# Altium PCB Bracelet_Aux_v1.0.PcbDoc
Units mil, origin at the board's own origin, x right, y up, seen from the top; angles counter-clockwise.
Board outline 590.55 x 236.42 mil, 2 copper layers (Top Layer, Bottom Layer), stack 57 mil thick; 9 components, 4 nets, 51 pads, 3 vias.
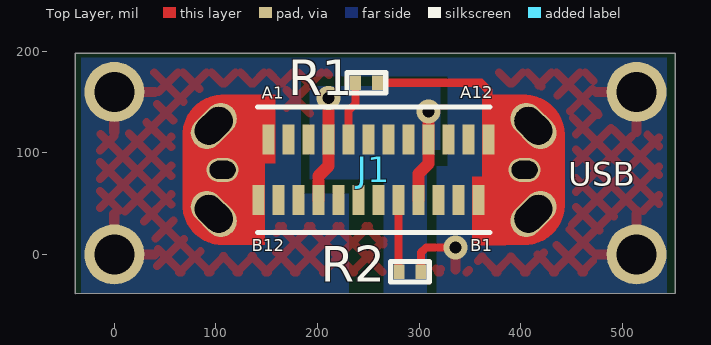
[diagram p0: Top Layer view]
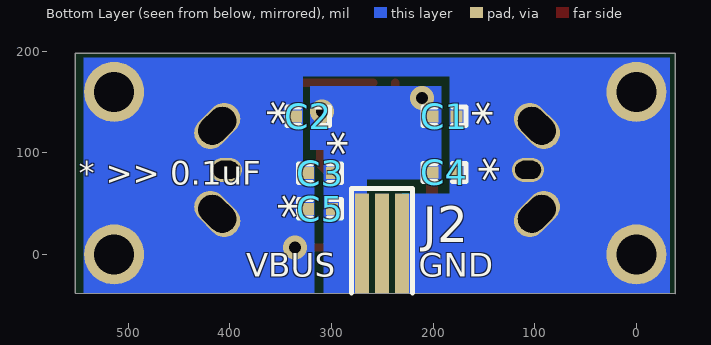
[diagram p1: Bottom Layer view, seen from below]
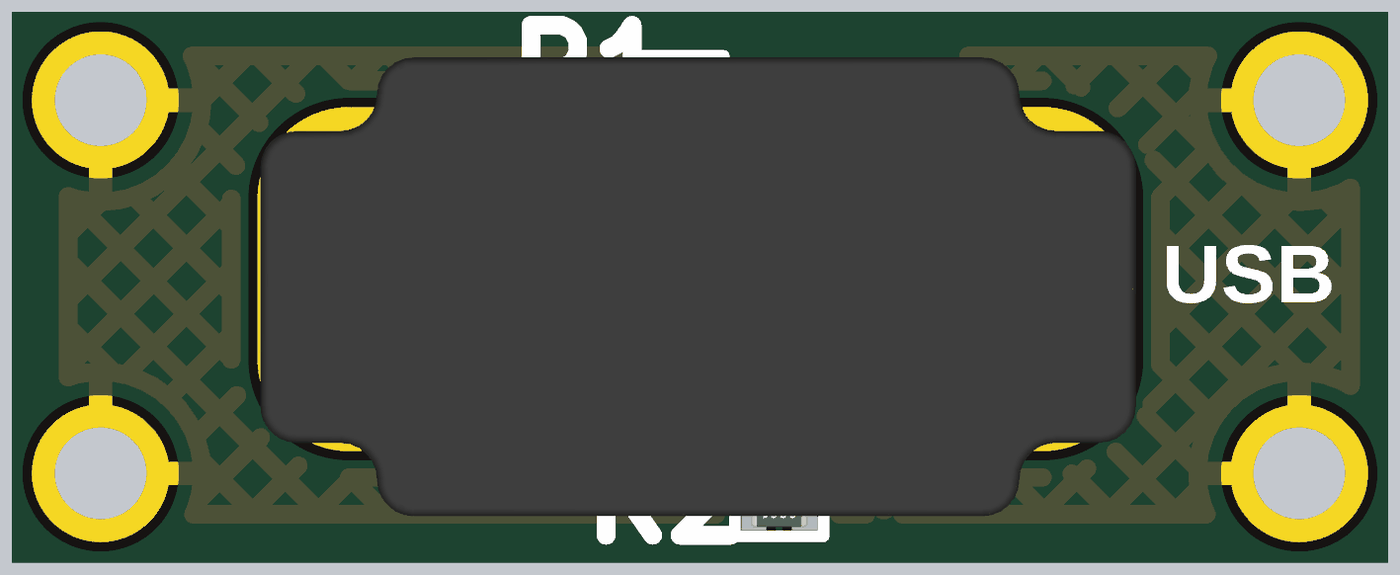
[diagram p2: 3D render of the assembled board from above, using the file's embedded part models]
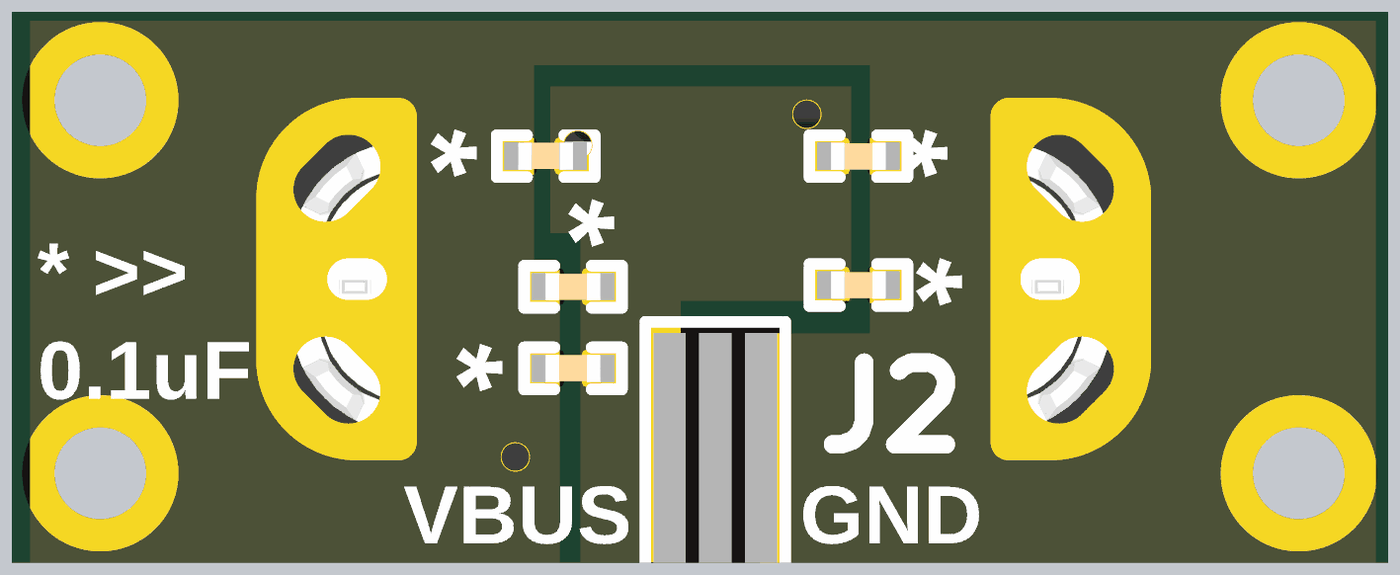
[diagram p3: 3D render of the assembled board from below, using the file's embedded part models]

## Layer stack, top to bottom
Top Solder: solder mask 3, Solder Resist, Dk 3.5
Top Layer: signal copper 10
Dielectric 1: dielectric 37, FR-4, Dk 4.8
Bottom Layer: signal copper 10
Bottom Solder: solder mask 3, Solder Resist, Dk 3.5

## Board outline
-38.35,-38.42 -38.35,198 552.2,198 552.2,-38.39

## Design rules (kind name [scope] priority, off if disabled: settings)
Clearance [All] p1: gap=7 ignorepadtopadclearanceinfootprint=FALSE except(0: Arc-Hole Track-Hole SMDPad-Hole THPad-Hole Via-Hole Fill-Hole Poly-Hole Region-Hole Text-Hole; 3: Arc-SMDPad Track-SMDPad SMDPad-SMDPad)
HoleToHoleClearance [All] p1: gap=0 allowstackedmicrovias=TRUE
MinimumSolderMaskSliver [All] p1: minsoldermaskwidth=0
PolygonConnect [All] p1: thpad.connectstyle=Relief thpad.reliefconductorwidth=10 thpad.reliefentries=4 thpad.polygonreliefangle="90 Angle" thpad.airgapwidth=10 smdpad.connectstyle=Direct smdpad.reliefconductorwidth=10 smdpad.reliefentries=4 smdpad.polygonreliefangle="90 Angle" smdpad.airgapwidth=10 via.connectstyle=Relief via.reliefconductorwidth=10 via.reliefentries=4 via.polygonreliefangle="90 Angle" via.airgapwidth=10
RoutingVias [All] p1: holewidth=11.81 width=23.62 viastyle="Through Hole" minholewidth=11.81 minwidth=23.62 maxholewidth=11.81 maxwidth=23.62
SilkToSilkClearance [All] p1: silktosilkclearance=0
SilkToSolderMaskClearance [IsPad] p1: minsilkscreentomaskgap=0 clearancetoexposedcopper=TRUE
SolderMaskExpansion [All] p1: expansion=4
Width [All] p1: maxlimit=40 minlimit=8 preferedwidth=22
26 further rules are at their usual default settings.

## Classes and differential pairs
component class U_Connector_Section: C1 C2 C3 C4 C5 J2 R1 R2

## Components (designator, comment, footprint, x,y, rotation, side; value= is the part's Value field where it differs from the comment)
C1 "0.1uF" "CAP 0201" 188.87,136 r180 bottom
C2 "0.1uF" "CAP 0201" 323,136 r0 bottom
C3 "0.1uF" "CAP 0201" 311.27,80 r0 bottom
C4 "0.1uF" "CAP 0201" 188.87,80.73 r180 bottom
C5 "0.1uF" "CAP 0201" 311.27,45 r0 bottom
J1 "CX80B1-24P" CX80B1-24P 255.24,83.28 r0 top locked
J2 "3 Pin FPC" "3 Pin FPC" 250.24,11 r180 bottom
R1 "5.1K" Res-0201 248.17,169 r180 top
R2 "5.1K" Res-0201 291,-17 r180 top

## Footprints (in the part's own frame and the unit in brackets; to place one, negate y for a bottom-side part, rotate by r counter-clockwise, add the part's x,y. Pads: shape width x height; smd on the part's side, far side on the other; paste and mask are expansions set on the pad)
"3 Pin FPC" [mm]
  rect 0.35x2.5 smd: 1(-0.5,0) 2(0,0) 3(0.5,0)
  silkscreen extent -0.76,-1.24 0.76,1.37
"CAP 0201" [mm]
  rect 0.3x0.3 smd mask+0.055: 1(-0.3,0) 2(0.3,0)
  silkscreen extent -0.53,-0.23 0.53,0.23, body extent -0.3,-0.15 0.3,0.15, height 0.28
CX80B1-24P [mm]
  rect 0.3x0.75 smd: A1(-2.625,0.755) A2(-2.125,0.755) A3(-1.625,0.755) A4(-1.125,0.755) A5(-0.625,0.755) A6(-0.125,0.755) A7(0.375,0.755) A8(0.875,0.755) A9(1.375,0.755) A10(1.875,0.755) A11(2.375,0.755) A12(2.875,0.755) B1(2.625,-0.755) B2(2.125,-0.755) B3(1.625,-0.755) B4(1.125,-0.755) B5(0.625,-0.755) B6(0.125,-0.755) B7(-0.375,-0.755) B8(-0.875,-0.755) B9(-1.375,-0.755) B10(-1.875,-0.755) B11(-2.375,-0.755) B12(-2.875,-0.755)
  oval 1.3x0.8 hole 0.7 slot 1.05 at 45 deg rot 45: MH1(-3.995,1.1) MH4(3.995,-1.1)
  oval 0.8x0.6 hole 0.45 slot 0.65 at 0 deg: MH2(-3.775,0) MH5(3.775,0)
  oval 1.3x0.8 hole 0.7 slot 1.05 at 135 deg rot 135: MH3(-3.995,-1.1) MH6(3.995,1.1)
  Top Layer region: 3.827,1.874 3.88,1.87 3.931,1.863 3.983,1.853 4.034,1.841 4.084,1.826 4.133,1.809 4.182,1.789 4.229,1.766 4.275,1.741 4.32,1.714 4.363,1.684 4.404,1.652 4.444,1.618 4.482,1.582 4.518,1.544 4.552,1.504 4.584,1.463 4.614,1.42 4.641,1.375 4.666,1.329 4.689,1.282 4.709,1.233 4.726,1.184 4.741,1.134 4.753,1.083 4.763,1.031 4.77,0.98 4.774,0.927 4.775,0.875 4.775,-0.875 4.774,-0.927 4.77,-0.98 4.763,-1.031 4.753,-1.083 4.741,-1.134 4.726,-1.184 4.709,-1.233 4.689,-1.282 4.666,-1.329 4.641,-1.375 4.614,-1.42 4.584,-1.463 4.552,-1.504 4.518,-1.544 4.482,-1.582 4.444,-1.618 4.404,-1.652 4.363,-1.684 4.32,-1.714 4.275,-1.741 4.229,-1.766 4.182,-1.789 4.133,-1.809 4.084,-1.826 4.034,-1.841 3.983,-1.853 3.931,-1.863 3.88,-1.87 3.827,-1.874 3.775,-1.875 3.325,-1.875 3.32,-1.875 3.315,-1.874 3.309,-1.874 3.304,-1.873 3.299,-1.872 3.294,-1.87 3.289,-1.868 3.284,-1.866 3.28,-1.864 3.275,-1.862 3.271,-1.859 3.266,-1.856 3.262,-1.853 3.258,-1.849 3.254,-1.846 3.251,-1.842 3.247,-1.838 3.244,-1.834 3.241,-1.829 3.238,-1.825 3.236,-1.82 3.234,-1.816 3.232,-1.811 3.23,-1.806 3.228,-1.801 3.227,-1.796 3.226,-1.791 3.226,-1.785 3.225,-1.78 3.225,-1.775 3.225,1.775 3.225,1.78 3.226,1.785 3.226,1.791 3.227,1.796 3.228,1.801 3.23,1.806 3.232,1.811 3.234,1.816 3.236,1.82 3.238,1.825 3.241,1.829 3.244,1.834 3.247,1.838 3.251,1.842 3.254,1.846 3.258,1.849 3.262,1.853 3.266,1.856 3.271,1.859 3.275,1.862 3.28,1.864 3.284,1.866 3.289,1.868 3.294,1.87 3.299,1.872 3.304,1.873 3.309,1.874 3.315,1.874 3.32,1.875 3.325,1.875 3.775,1.875
  Top Layer region: -3.32,1.875 -3.315,1.874 -3.309,1.874 -3.304,1.873 -3.299,1.872 -3.294,1.87 -3.289,1.868 -3.284,1.866 -3.28,1.864 -3.275,1.862 -3.271,1.859 -3.266,1.856 -3.262,1.853 -3.258,1.849 -3.254,1.846 -3.251,1.842 -3.247,1.838 -3.244,1.834 -3.241,1.829 -3.238,1.825 -3.236,1.82 -3.234,1.816 -3.232,1.811 -3.23,1.806 -3.228,1.801 -3.227,1.796 -3.226,1.791 -3.226,1.785 -3.225,1.78 -3.225,1.775 -3.225,-1.775 -3.225,-1.78 -3.226,-1.785 -3.226,-1.791 -3.227,-1.796 -3.228,-1.801 -3.23,-1.806 -3.232,-1.811 -3.234,-1.816 -3.236,-1.82 -3.238,-1.825 -3.241,-1.829 -3.244,-1.834 -3.247,-1.838 -3.251,-1.842 -3.254,-1.846 -3.258,-1.849 -3.262,-1.853 -3.266,-1.856 -3.271,-1.859 -3.275,-1.862 -3.28,-1.864 -3.284,-1.866 -3.289,-1.868 -3.294,-1.87 -3.299,-1.872 -3.304,-1.873 -3.309,-1.874 -3.315,-1.874 -3.32,-1.875 -3.325,-1.875 -3.775,-1.875 -3.827,-1.874 -3.88,-1.87 -3.931,-1.863 -3.983,-1.853 -4.034,-1.841 -4.084,-1.826 -4.133,-1.809 -4.182,-1.789 -4.229,-1.766 -4.275,-1.741 -4.32,-1.714 -4.363,-1.684 -4.404,-1.652 -4.444,-1.618 -4.482,-1.582 -4.518,-1.544 -4.552,-1.504 -4.584,-1.463 -4.614,-1.42 -4.641,-1.375 -4.666,-1.329 -4.689,-1.282 -4.709,-1.233 -4.726,-1.184 -4.741,-1.134 -4.753,-1.083 -4.763,-1.031 -4.77,-0.98 -4.774,-0.927 -4.775,-0.875 -4.775,0.875 -4.774,0.927 -4.77,0.98 -4.763,1.031 -4.753,1.083 -4.741,1.134 -4.726,1.184 -4.709,1.233 -4.689,1.282 -4.666,1.329 -4.641,1.375 -4.614,1.42 -4.584,1.463 -4.552,1.504 -4.518,1.544 -4.482,1.582 -4.444,1.618 -4.404,1.652 -4.363,1.684 -4.32,1.714 -4.275,1.741 -4.229,1.766 -4.182,1.789 -4.133,1.809 -4.084,1.826 -4.034,1.841 -3.983,1.853 -3.931,1.863 -3.88,1.87 -3.827,1.874 -3.775,1.875 -3.325,1.875
  Bottom Layer region: -3.32,1.875 -3.315,1.874 -3.309,1.874 -3.304,1.873 -3.299,1.872 -3.294,1.87 -3.289,1.868 -3.284,1.866 -3.28,1.864 -3.275,1.862 -3.271,1.859 -3.266,1.856 -3.262,1.853 -3.258,1.849 -3.254,1.846 -3.251,1.842 -3.247,1.838 -3.244,1.834 -3.241,1.829 -3.238,1.825 -3.236,1.82 -3.234,1.816 -3.232,1.811 -3.23,1.806 -3.228,1.801 -3.227,1.796 -3.226,1.791 -3.226,1.785 -3.225,1.78 -3.225,1.775 -3.225,-1.775 -3.225,-1.78 -3.226,-1.785 -3.226,-1.791 -3.227,-1.796 -3.228,-1.801 -3.23,-1.806 -3.232,-1.811 -3.234,-1.816 -3.236,-1.82 -3.238,-1.825 -3.241,-1.829 -3.244,-1.834 -3.247,-1.838 -3.251,-1.842 -3.254,-1.846 -3.258,-1.849 -3.262,-1.853 -3.266,-1.856 -3.271,-1.859 -3.275,-1.862 -3.28,-1.864 -3.284,-1.866 -3.289,-1.868 -3.294,-1.87 -3.299,-1.872 -3.304,-1.873 -3.309,-1.874 -3.315,-1.874 -3.32,-1.875 -3.325,-1.875 -3.775,-1.875 -3.827,-1.874 -3.88,-1.87 -3.931,-1.863 -3.983,-1.853 -4.034,-1.841 -4.084,-1.826 -4.133,-1.809 -4.182,-1.789 -4.229,-1.766 -4.275,-1.741 -4.32,-1.714 -4.363,-1.684 -4.404,-1.652 -4.444,-1.618 -4.482,-1.582 -4.518,-1.544 -4.552,-1.504 -4.584,-1.463 -4.614,-1.42 -4.641,-1.375 -4.666,-1.329 -4.689,-1.282 -4.709,-1.233 -4.726,-1.184 -4.741,-1.134 -4.753,-1.083 -4.763,-1.031 -4.77,-0.98 -4.774,-0.927 -4.775,-0.875 -4.775,0.875 -4.774,0.927 -4.77,0.98 -4.763,1.031 -4.753,1.083 -4.741,1.134 -4.726,1.184 -4.709,1.233 -4.689,1.282 -4.666,1.329 -4.641,1.375 -4.614,1.42 -4.584,1.463 -4.552,1.504 -4.518,1.544 -4.482,1.582 -4.444,1.618 -4.404,1.652 -4.363,1.684 -4.32,1.714 -4.275,1.741 -4.229,1.766 -4.182,1.789 -4.133,1.809 -4.084,1.826 -4.034,1.841 -3.983,1.853 -3.931,1.863 -3.88,1.87 -3.827,1.874 -3.775,1.875 -3.325,1.875
  Bottom Layer region: 3.827,1.874 3.88,1.87 3.931,1.863 3.983,1.853 4.034,1.841 4.084,1.826 4.133,1.809 4.182,1.789 4.229,1.766 4.275,1.741 4.32,1.714 4.363,1.684 4.404,1.652 4.444,1.618 4.482,1.582 4.518,1.544 4.552,1.504 4.584,1.463 4.614,1.42 4.641,1.375 4.666,1.329 4.689,1.282 4.709,1.233 4.726,1.184 4.741,1.134 4.753,1.083 4.763,1.031 4.77,0.98 4.774,0.927 4.775,0.875 4.775,-0.875 4.774,-0.927 4.77,-0.98 4.763,-1.031 4.753,-1.083 4.741,-1.134 4.726,-1.184 4.709,-1.233 4.689,-1.282 4.666,-1.329 4.641,-1.375 4.614,-1.42 4.584,-1.463 4.552,-1.504 4.518,-1.544 4.482,-1.582 4.444,-1.618 4.404,-1.652 4.363,-1.684 4.32,-1.714 4.275,-1.741 4.229,-1.766 4.182,-1.789 4.133,-1.809 4.084,-1.826 4.034,-1.841 3.983,-1.853 3.931,-1.863 3.88,-1.87 3.827,-1.874 3.775,-1.875 3.325,-1.875 3.32,-1.875 3.315,-1.874 3.309,-1.874 3.304,-1.873 3.299,-1.872 3.294,-1.87 3.289,-1.868 3.284,-1.866 3.28,-1.864 3.275,-1.862 3.271,-1.859 3.266,-1.856 3.262,-1.853 3.258,-1.849 3.254,-1.846 3.251,-1.842 3.247,-1.838 3.244,-1.834 3.241,-1.829 3.238,-1.825 3.236,-1.82 3.234,-1.816 3.232,-1.811 3.23,-1.806 3.228,-1.801 3.227,-1.796 3.226,-1.791 3.226,-1.785 3.225,-1.78 3.225,-1.775 3.225,1.775 3.225,1.78 3.226,1.785 3.226,1.791 3.227,1.796 3.228,1.801 3.23,1.806 3.232,1.811 3.234,1.816 3.236,1.82 3.238,1.825 3.241,1.829 3.244,1.834 3.247,1.838 3.251,1.842 3.254,1.846 3.258,1.849 3.262,1.853 3.266,1.856 3.271,1.859 3.275,1.862 3.28,1.864 3.284,1.866 3.289,1.868 3.294,1.87 3.299,1.872 3.304,1.873 3.309,1.874 3.315,1.874 3.32,1.875 3.325,1.875 3.775,1.875
  silkscreen extent -2.9,-1.57 2.91,1.57, body extent -4.74,-2.58 4.8,2.42, height 7.19
Res-0201 [mm]
  rect 0.27x0.37 smd: 1(-0.275,0) 2(0.275,0)
  silkscreen extent -0.48,-0.25 0.48,0.25, body extent -0.3,-0.15 0.3,0.15, height 0.29

## Part data
C1 C2 C3 C4 C5: library part GRM033R61E104KE14D, "Multilayer Ceramic Capacitors MLCC - SMD/SMT 0201 0.1uF 25volts X5R 10%", Capacitance=100nF, Case/Package=0201, Case Code (Metric)=0603, Dielectric=X5R, Manufacturer=Murata, Max Operating Temperature=85°C, Min Operating Temperature=-55°C, Package Quantity=15000, Resistor Type=Ceramic, Supplier Part Number 1=81-GRM033R61E104KE4D, Tolerance=10%, Voltage Rating=25V, Case Code (Imperial)=0201, Category="Ceramic Capacitors", ComponentLink1Description=http://www.farnell.com/datasheets/2867843.pdf?src-supplier=Farnell, ComponentLink1URL=http://www.farnell.com/datasheets/2867843.pdf?src-supplier=Farnell, ComponentLink2Description=http://www.mouser.com/ds/2/281/c02e-2905.pdf?src-supplier=Mouser, ComponentLink2URL=http://www.mouser.com/ds/2/281/c02e-2905.pdf?src-supplier=Mouser, ComponentLink3Description=http://search.murata.co.jp/Ceramy/image/img/A01X/G101/ENG/GRM033R61E104KE14-01.pdf?src-supplier=Digi-Key, ComponentLink3URL=http://search.murata.co.jp/Ceramy/image/img/A01X/G101/ENG/GRM033R61E104KE14-01.pdf?src-supplier=Digi-Key, ComponentLink4Description=http://www.farnell.com/datasheets/2867843.pdf?src-supplier=Newark, ComponentLink4URL=http://www.farnell.com/datasheets/2867843.pdf?src-supplier=Newark, Height=0.3mm, Lead Free="Lead Free", Length=0.024inch, Manufacturer Part Number=GRM033R61E104KE14D, Mount="Surface Mount", Packaging="Tape and Reel", Pricing 1="1=0.10000, 10=0.03100, 50=0.03100, 100=0.02500, 1000=0.01700, 10000=0.01400 (USD)", RoHS=Yes, RoHS Compliant=Yes, Stock 1=22478, Supplier 1=Mouser, Termination=SMD/SMT, Thickness=0.013inch, Voltage Rating (DC)=25V, Weight=1.2E-05oz, Width=0.012inch
J1: "CONN RCPT USB3.1 TYPE C SMT VERT", Current Rating=1.25A, Flammability Rating="UL94 V-0", Insulation Color=Black, Manufacturer=Hirose, Max Operating Temperature=85°C, Min Operating Temperature=-40°C, Supplier Part Number 1=26-CX80B1-24PCT-ND, Category=Connectors, ComponentLink1Description=https://www.hirose.com/product/download/?distributor=digikey&amp;type=2d&amp;lang=en&amp;num=CX80B1-24P&src-supplier=Digi-Key, ComponentLink1URL=https://www.hirose.com/product/download/?distributor=digikey&amp;type=2d&amp;lang=en&amp;num=CX80B1-24P&src-supplier=Digi-Key, Connector Type=USB, Contact Plating=Gold, Gender=Receptacle, Manufacturer Part Number=CX80B1-24P, Mating Cycles=10000, Mount="Surface Mount,Through Hole", Number of Contacts=24, Number of Ports=1, Packaging="Cut Tape", Pricing 1="1=3.23000, 10=3.09600, 25=2.83800, 50=2.70900, 100=2.58000, 250=2.25752 (USD)", RoHS=Yes, Shielding=Shielded, Stock 1=1, Supplier 1=Digi-Key, Termination=Solder
J2: "CONN FPC 3POS 0.5MM SMD R/A", ComponentLink1Description=https://www.molex.com/pdm_docs/pk/5051479200-200.pdf?src-supplier=Digi-Key, ComponentLink1URL=https://www.molex.com/pdm_docs/pk/5051479200-200.pdf?src-supplier=Digi-Key, ComponentLink2Description=http://www.molex.com/pdm_docs/sd/5051470390_sd.pdf?src-supplier=Digi-Key, ComponentLink2URL=http://www.molex.com/pdm_docs/sd/5051470390_sd.pdf?src-supplier=Digi-Key, ComponentLink3Description=https://www.molex.com/pdm_docs/sd/5051470390_sd.pdf?src-supplier=Digi-Key, ComponentLink3URL=https://www.molex.com/pdm_docs/sd/5051470390_sd.pdf?src-supplier=Digi-Key
R1 R2: library part WR02X512JAL, "Res 5.1K Ohm 5% 1/20W 0201", Manufacturer="Walsin Technologies", Supplier Part Number 1=1292-WR02X512JALTR-ND, Manufacturer Part Number=WR02X512JAL, Pricing 1="15000=0.00209 (USD)", RoHS Compliant=Yes, Supplier 1=DigiKey

## Free pads (board coordinates)
  round 59.06 hole 39.37: MH1(514,160) MH2(514,0) MH3(0,0) MH4(0,160)

## Via types
v1: diameter 23.62, hole 11.81, Top Layer to Bottom Layer, tented both sides, 3 vias

## Nets (pads, with @x,y where several pads share a name; then routed paths per layer and width w, separated by ;. In a path a pad name is that pad's centre, name@x,y a point inside that pad or via, vN(x,y) a via of type N, cw(c..) or ccw(c..) an arc to the next point about the centre after c; other vN are vias at no path point)
GND: C1.2 C2.2 C3.2 C4.2 C5.2 J1.A1 J1.A12 J1.B1 J1.B12 J1.MH1 J1.MH2 J1.MH3 J1.MH4 J1.MH5 J1.MH6 J2.3 pad.MH1 pad.MH2 pad.MH3 pad.MH4 R1.1 R2.1 | length 234.7
  Top Layer w8: R1.1 361,169 368.43,161.57 J1.A12 ; R2.1 301.83,1.83 307,7 v1(336,7)
  Top Layer w12: 142.05,35.05 J1.B12
NetJ1_A5: J1.A5 R1.2 | length 59.3
  Top Layer w8: J1.A5@231,113.37 J1.A5 230.63,141.63 237.35,148.35 R1.2
NetJ1_B5: J1.B5 R2.2 | length 70.8
  Top Layer w8: R2.2@279.17,-17 279.84,-16.33 J1.B5
VBUS: C1.1 C2.1 C3.1 C4.1 C5.1 J1.A4 J1.A9 J1.B4 J1.B9 J2.1 | length 195.9
  Top Layer w12: J1.B9 201.1,77.24 210.94,87.08 J1.A4 v1@210.94,154 ; J1.B4 299.53,79.53 309.37,89.37 J1.A9 309.37,140.59 v1(309.19,140.77)
  other v1: 211,154
pads on no net: J1.A2 J1.A3 J1.A6 J1.A7 J1.A8 J1.A10 J1.A11 J1.B2 J1.B3 J1.B6 J1.B7 J1.B8 J1.B10 J1.B11 J2.2

## Polygon pours and split planes (outlines as drawn)
GND on Top Layer "Polygon_1" (hatched 45Degree grid 20 track 8, remove dead copper, pour order 6): -14,179 -14,-17.59 536,-17.59 536,179

## Other copper
Top Layer:
  region net GND: 148.47,157.55 125.15,157.55 125.15,9.25 148.47,9.25
  region net GND: 158.47,157.55 130.47,157.55 130.47,89.55 158.47,89.55
  rectangle net GND: 352,9 380,77
  rectangle net GND: 362,9 385.32,157.3
Bottom Layer:
  rectangle net GND: 165,175 348,194
  rectangle net GND: 147,-38.42 231,60
  rectangle net GND: -33,-38.42 184,194
  rectangle net GND: 317,-38.42 384,87
  rectangle net GND: 328,-38.42 544,194
  rectangle net VBUS: 192,74 308,129
  rectangle net VBUS: 192,103 321,166
  rectangle net VBUS: 265,-38 308,89

## Silkscreen, mask and mechanical layers (free items; w line width, h text height)
Top Overlay:
  text "USB" at 447,60 h40
Bottom Overlay:
  text "*" at 187.05,126.85 h60 r90
  text "*" at 389,127 h60 r90
  text "*" at 330,97 h60 r90
  text "*" at 180.87,71.73 h60 r90
  text "* >> 0.1uF" at 549,61 h40
  text "*" at 378,35 h60 r90
  text "GND" at 214,-30 h40
  text "VBUS" at 384,-30 h40
Mechanical 2:
  the board outline again, w10

## Dimensions
-38.35,198 to -38.35,-38.39 on Mechanical 1
-38.35,198 to 552.2,198 on Mechanical 1

## Text inside footprints (layer, text, board x,y; h text height)
J1: Top Overlay "A1" at 145.24,153.28 h12; Top Overlay "A12" at 340.42,153.55 h12; Top Overlay "B12" at 135.24,3.28 h12; Top Overlay "B1" at 350.24,3.28 h12